# Altium PCB PCB1.PcbDoc
Units mil, origin at the board's own origin, x right, y up, seen from the top; angles counter-clockwise.
Board outline 2950 x 2951.3 mil, 2 copper layers (Top Layer, Bottom Layer); 36 components, 0 nets, 96 pads, 18 vias.
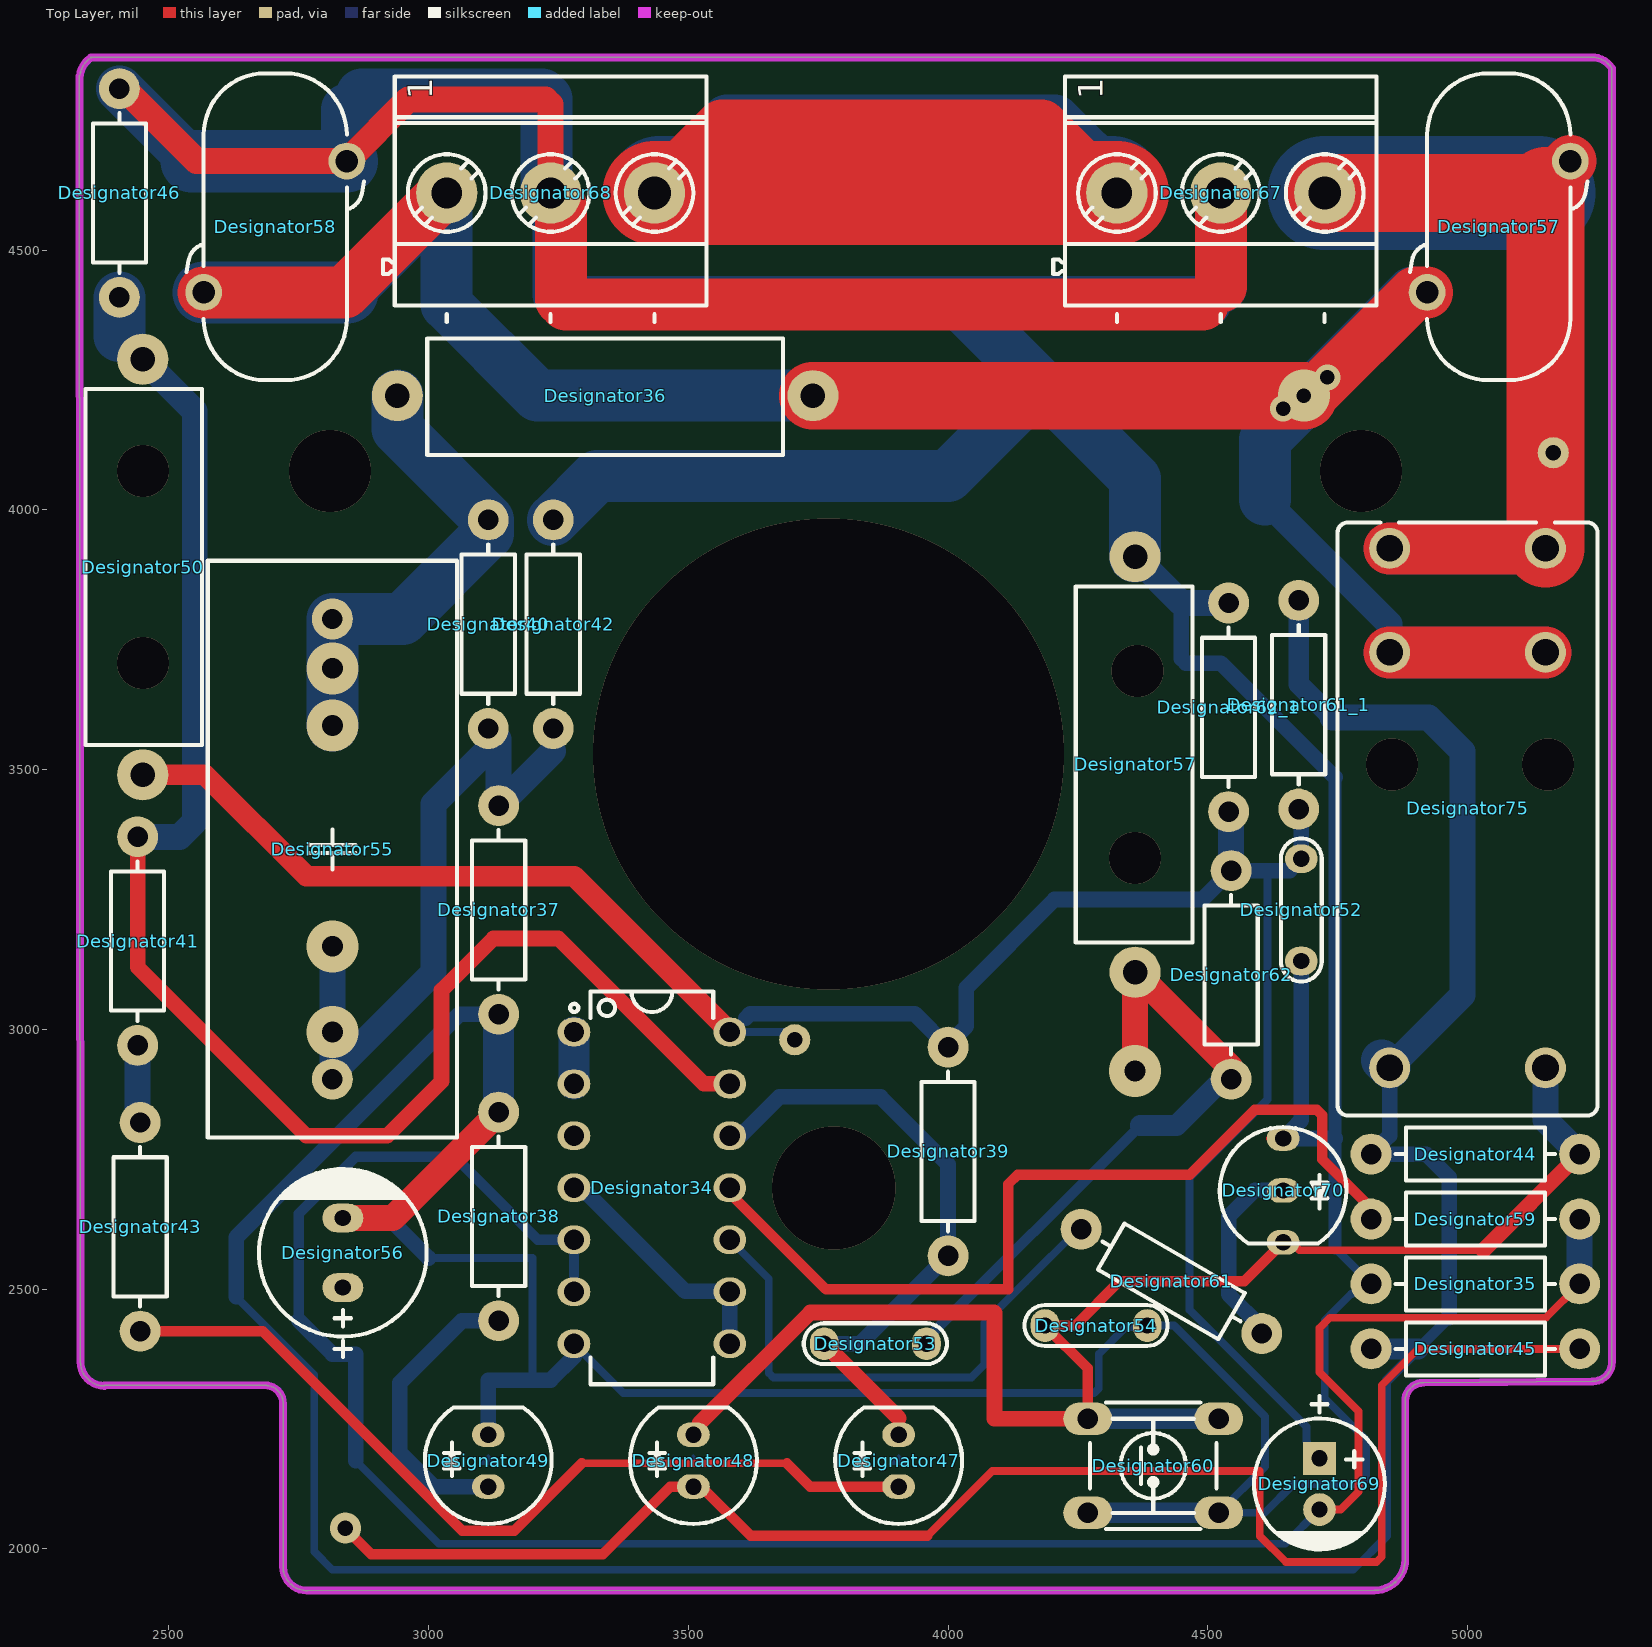
[diagram p0: Top Layer view]
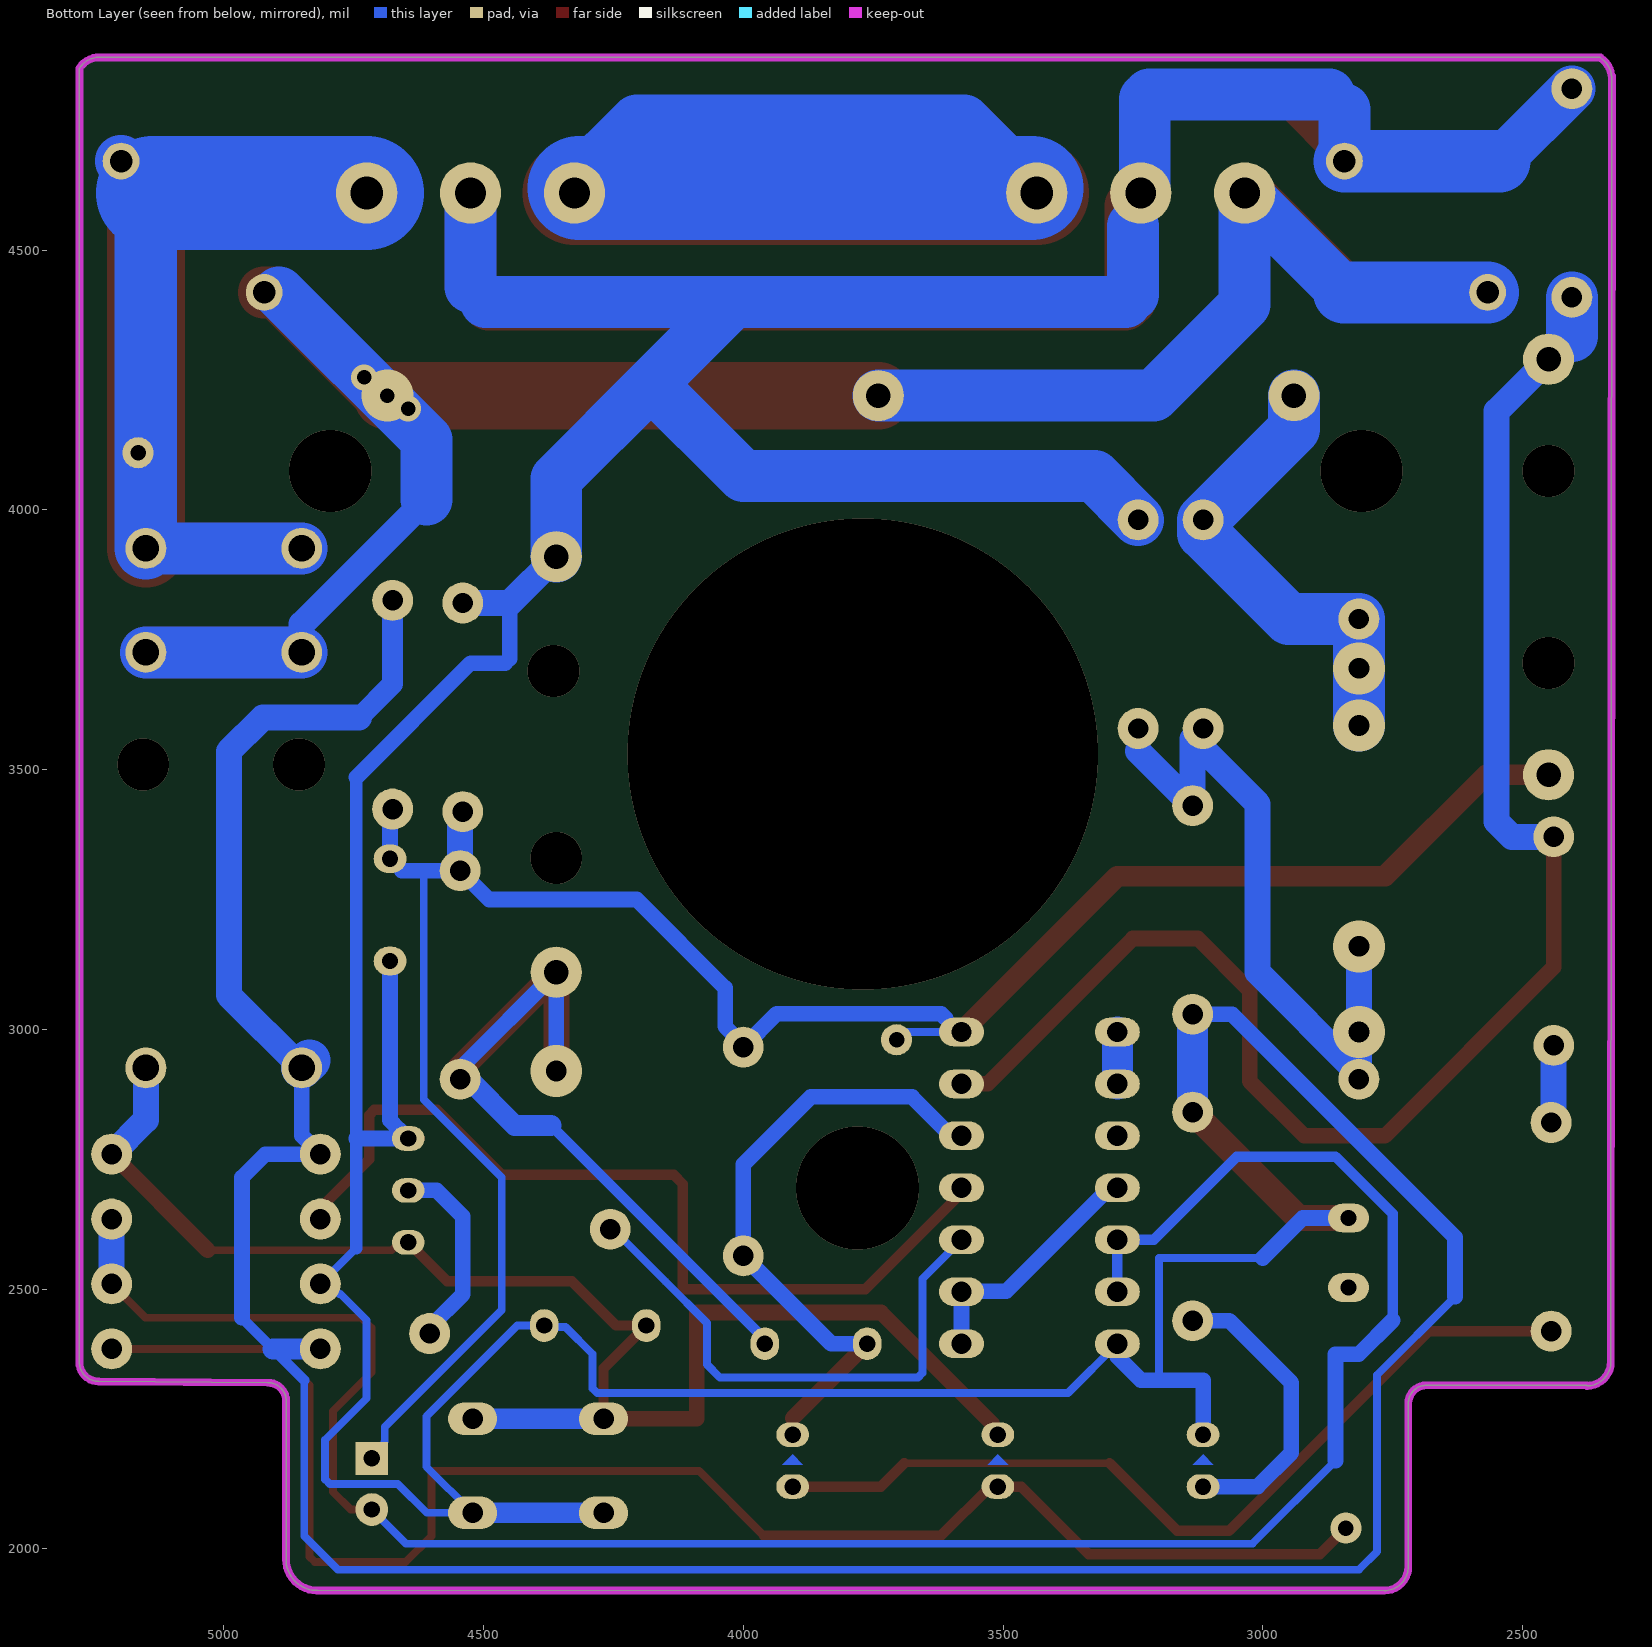
[diagram p1: Bottom Layer view, seen from below]

## Layer stack, top to bottom
Top Solder: solder mask 0.4, Solder Resist, Dk 3.5
Top Layer: signal copper 1.4
Dielectric 1: dielectric 12.6, FR-4, Dk 4.8
Bottom Layer: signal copper 1.4
Bottom Solder: solder mask 0.4, Solder Resist, Dk 3.5

## Board outline
2720,1965.89 ccw(c2766.16,1965.89) 2766.16,1919.74 4820.34,1920 ccw(c4820.34,1979.86) 4880.2,1979.86 4880,2285 cw(c4915,2285) 4915,2320 5240.77,2322.32 ccw(c5240.77,2359.49) 5277.94,2359.49 5277.94,4850 ccw(c5239,4825.21) 5244.58,4871.03 5245,4871 2350,4871 2350,4870 ccw(c2374.79,4831.06) 2328.97,4836.63 2327.94,4835 2330.04,2359.96 ccw(c2376.16,2359.96) 2376.16,2313.84 2376.16,2315 2685,2315 cw(c2685,2280) 2720,2280

## Design rules (kind name [scope] priority, off if disabled: settings)
Clearance [All] p1: gap=7 ignorepadtopadclearanceinfootprint=FALSE
PolygonConnect [All] p1: connectstyle=Relief reliefconductorwidth=10 reliefentries=4 polygonreliefangle="90 Angle" airgapwidth=10
RoutingVias [All] p1: holewidth=28 width=50 viastyle="Through Hole" minholewidth=28 minwidth=50 maxholewidth=28 maxwidth=50
SolderMaskExpansion [All] p1: expansion=4 istentingtop=FALSE
Width [All] p1: maxlimit=500 minlimit=10 preferedwidth=15 minimp=50.000000 maximp=50.000000 favimp=50.000000
30 further rules are at their usual default settings.

## Components (designator, comment, footprint, x,y, rotation, side; value= is the part's Value field where it differs from the comment)
Designator34 "Comment" DIP_14 3430,2695 r0 top
Designator35 "Comment" R025W_AX04 5015,2510 r0 top
Designator36 "Comment" R2W_AX08 3340,4220 r0 top
Designator37 "Comment" R025W_AX04 3135,3230 r90 top
Designator38 "Comment" R025W_AX04 3135,2640 r90 top
Designator39 "Comment" R025W_AX04 4000,2765 r270 top
Designator40 "Comment" R025W_AX04 3115,3780 r90 top
Designator41 "Comment" R025W_AX04 2440,3170 r90 top
Designator42 "Comment" R025W_AX04 3240,3780 r90 top
Designator43 "Comment" R025W_AX04 2445,2620 r90 top
Designator44 "Comment" R025W_AX04 5015,2760 r0 top
Designator45 "Comment" R025W_AX04 5015,2385 r0 top
Designator46 "Comment" R025W_AX04 2405,4610 r90 top
Designator47 "Comment" LED5MM_YLW 3905,2170 r90 top
Designator48 "Comment" LED5MM_YLW 3510,2170 r90 top
Designator49 "Comment" LED5MM_YLW 3115,2170 r90 top
Designator50 "Comment" R2W_AX08 2450,3890 r90 top
Designator52 "Comment" C_CER_D7 4680,3230 r90 top
Designator53 "Comment" C_CER_D7 3860,2395 r0 top
Designator54 "Comment" C_CER_D7 4285,2430 r0 top
Designator55 "Comment" C_FLM_28X12H21 2815,3347.09 r90 top
Designator56 "Comment" C_EL_8X14 2835,2570 r90 top
Designator57 "Comment" C_CERM_D15X9 5060,4545 r90 top
Designator57 "Comment" R2W_AX08 4360,3510 r270 top
Designator58 "Comment" C_CERM_D15X9 2705,4545 r90 top
Designator59 "Comment" R025W_AX04 5015,2635 r0 top
Designator60 "Comment" SWPBT_SPDT_6X6X8TL 4395,2160 r0 top
Designator61 "Comment" R025W_AX04 4430,2515 r150 top
Designator61_1 "Comment" R025W_AX04 4675,3625 r90 top
Designator62 "Comment" R025W_AX04 4545,3105 r90 top
Designator62_1 "Comment" R025W_AX04 4540,3620 r90 top
Designator67 "Comment" PHOENIX_1707917 4525,4610 r0 top
Designator68 "Comment" PHOENIX_1707917 3235,4610 r0 top
Designator69 "Comment" C_EL_6X7 4715,2125 r270 top
Designator70 "Comment" LED5BI 4645,2690 r270 top
Designator75 "Comment" REL_TYCO_SCHRACK_RT44XXXX 5000,3405 r90 top

## Footprints (in the part's own frame and the unit in brackets; to place one, negate y for a bottom-side part, rotate by r counter-clockwise, add the part's x,y. Pads: shape width x height; smd on the part's side, far side on the other; paste and mask are expansions set on the pad)
C_CER_D7 [mm] "CAP, CER MULTILAYER, 7.0X1.7mm, pitch: 5.0mm"
  oval 1.4x1.6 hole 0.8 mask+0.075: 1(-2.5,0) 2(2.5,0)
  silkscreen extent -3.5,-1 3.5,1, body extent -3.5,-0.85 3.5,0.85
C_CERM_D15X9 [mm] "CAP, CER, High Voltage MultiLayer"
  round 1.8 hole 1.1: 1(-3.211,3.5) 2(3.211,-3.5)
  silkscreen extent -7.5,-4.34 7.5,4.33, body extent -7.5,-4.5 7.5,4.5, height 19
C_EL_6X7 [mm] "Capacitor Electrolythic, D6.3X7.0H pitch: 2.5mm"
  rect 1.6x1.6 hole 0.8: 1(-1.25,0)
  round 1.6 hole 0.8: 2(1.25,0)
  silkscreen extent -4.3,-3.2 3.2,3.2, body extent -2.99,-2.99 3,3, height 7.3
C_EL_8X14 [mm] "Capacitor Electrolythic, D8X14H pitch: 3.5mm"
  oval 1.4x2 hole 0.8: 1(-1.7,0) 2(1.7,0)
  silkscreen extent -5.1,-4.1 4.1,4.1, body extent -4.09,-4.1 4.1,4.1, height 14.6
C_FLM_28X12H21 [mm] "Capacitor, THT, Metallized Polyester Film with 28x12x21mm LxTxH"
  round 2 hole 1: 1(-11.25,0) 2(11.25,0)
  silkscreen extent -14.1,-6.1 14.1,6.1, body extent -14,-6 14,6, height 24
DIP_14 [mm] "DIP, pitch 2.54mm, 300mil Width"
  oval 1.6x1.4 / inner round 1.4 / far side oval 2.2x1.4 hole 1: 1(-3.81,7.62) 2(-3.81,5.08) 3(-3.81,2.54) 4(-3.81,0) 5(-3.81,-2.54) 6(-3.81,-5.08) 7(-3.81,-7.62) 8(3.81,-7.62) 9(3.81,-5.08) 10(3.81,-2.54) 11(3.81,0) 12(3.81,2.54) 13(3.81,5.08) 14(3.81,7.62)
  silkscreen extent -4,-9.6 3,9.6, body extent -4,-9.53 4,9.52, height 3.81
LED5BI [mm] "LED THD 5MM BICOLOR"
  oval 1.2x1.6 hole 0.8: 1(-2.54,0) 2(0,0) 3(2.54,0)
  silkscreen extent -3.1,-3.1 2.6,3.1, body extent -2.95,-2.95 2.79,2.95, height 11.01
LED5MM_YLW [mm] "LED THD 5MM YELLOW"
  oval 1.2x1.6 hole 0.8: 1(-1.27,0) 2(1.27,0)
  Bottom Layer region: -0.2,0.5 -0.2,-0.5 0.3,0
  silkscreen extent -3.1,-3.1 2.6,3.1, body extent -3,-3 2.5,3, height 9.14
PHOENIX_1707917 [mm] "PHOENIX MKDS Serie, Pitch 5.08mm, 24A, 400V, 3 Positions Header"
  round 3 hole 1.5: 1(-5.08,0) 2(0,0)
  round 3 hole 1.6: 3(5.08,0)
  silkscreen extent -8.19,-6.31 7.62,5.7, body extent -8.19,-5.5 7.62,5.7, height 18.29
R2W_AX08 [mm] "RESISTOR 2 WATT, AXIAL0.8"
  round 2.5 hole 1.2: 1(-10.16,0) 2(10.16,0)
  silkscreen extent -8.7,-2.9 8.7,2.8, body extent -10.51,-2.8 10.51,2.7, height 5.5
R025W_AX04 [mm] "RESISTOR 1/4 WATT, AXIAL0.4"
  round 2 hole 1: 1(-5.1,0) 2(5.1,0)
  silkscreen extent -3.9,-1.3 3.9,1.3, body extent -5.38,-1.28 5.38,1.28, height 2.6
REL_TYCO_SCHRACK_RT44XXXX [mm] "6 Leads, Row Spacing 7.5 mm; Body 29mm x 12.7mm, TYCO RT2 Series"
  round 2 hole 1.3: 11(8.15,-3.81) 14(13.23,-3.81) 21(8.15,3.81) 24(13.23,3.81) A1(-12.17,-3.81) A2(-12.17,3.81)
  silkscreen extent -14.5,-6.35 14.5,6.35, body extent -14.52,-6.43 14.48,6.27, height 15.7
SWPBT_SPDT_6X6X8TL [mm] "SWITCH, PUSHBUTTON, THD, SPDT, 8.0mm, TL-1105-C"
  oval 2.4x1.6 hole 1 mask+0.1: 1(-3.2,2.3) 2(-3.2,-2.3) 3(3.2,-2.3) 4(3.2,2.3)
  silkscreen extent -3.1,-3.1 3.1,3.1, body extent -3.95,-3 3.95,3, height 8

## Free pads (board coordinates)
  round 60 hole 30: 2(2840,2040) 2(3705,2980) 3(5165,4110)

## Via types
v1: diameter 100, hole 100, Top Layer to Bottom Layer, 6 vias
v2: diameter 100, hole 40, Top Layer to Bottom Layer, 5 vias
v3: diameter 50, hole 28, Top Layer to Bottom Layer, 2 vias
v4: diameter 158, hole 158, Top Layer to Bottom Layer, 2 vias
v5: diameter 100, hole 28, Top Layer to Bottom Layer, 1 vias
v6: diameter 237, hole 237, Top Layer to Bottom Layer, 1 vias
v7: diameter 906, hole 906, Top Layer to Bottom Layer, 1 vias

## Nets (pads, with @x,y where several pads share a name; then routed paths per layer and width w, separated by ;. In a path a pad name is that pad's centre, name@x,y a point inside that pad or via, vN(x,y) a via of type N, cw(c..) or ccw(c..) an arc to the next point about the centre after c; other vN are vias at no path point)
pads on no net: Designator34.1 Designator34.2 Designator34.3 Designator34.4 Designator34.5 Designator34.6 Designator34.7 Designator34.8 Designator34.9 Designator34.10 Designator34.11 Designator34.12 Designator34.13 Designator34.14 Designator35.1 Designator35.2 Designator36.1 Designator36.2 Designator37.1 Designator37.2 Designator38.1 Designator38.2 Designator39.1 Designator39.2 Designator40.1 Designator40.2 Designator41.1 Designator41.2 Designator42.1 Designator42.2 Designator43.1 Designator43.2 Designator44.1 Designator44.2 Designator45.1 Designator45.2 Designator46.1 Designator46.2 Designator47.1 Designator47.2 Designator48.1 Designator48.2 Designator49.1 Designator49.2 Designator50.1 Designator50.2 Designator52.1 Designator52.2 Designator53.1 Designator53.2 Designator54.1 Designator54.2 Designator55.1 Designator55.2 Designator56.1 Designator56.2 Designator57.1 Designator57.2 Designator58.1 Designator58.2 Designator59.1 Designator59.2 Designator60.1 Designator60.2 Designator60.3 Designator60.4 Designator61.1 Designator61.2 Designator61_1.1 Designator61_1.2 Designator62.1 Designator62.2 Designator62_1.1 Designator62_1.2 Designator67.1 Designator67.2 Designator67.3 Designator68.1 Designator68.2 Designator68.3 Designator69.1 Designator69.2 Designator70.1 Designator70.2 Designator70.3 Designator75.11 Designator75.14 Designator75.21 Designator75.24 Designator75.A1 Designator75.A2
copper on no net: | length 60634.6
  Top Layer w15: 2405,4810.79 2414.21,4810.79 ; 3030,4610 3035,4610 ; 3225,4790 3235,4780 ; 3230,4430 3265,4395 ; 3295,2165 3690,2165 ; 3510,2120 3525,2120 ; 3580,2685 3580,2695 ; 3905,2220 3905,2251.57 ; 3958.43,2395 3958.43,2403.43 ; 3960,2025 4085,2150 4600,2150 4600,2025 4650,1975 4825,1975 4835,1985 4835,2315 4905,2385 4980,2385 5215.79,2385 ; 4088.9,2455 4089.45,2454.45 ; 4310,4610 4325,4610 ; 4490,4395 4525,4430 ; 4544.21,2905 4545,2904.21 4545,2925 ; 4620,2790 4645,2790 ; 4645,2590 4661.6,2590 4676.6,2575 4740,2575 5030.79,2575 ; v5(4685,4220) v5@4723.63,4220 ; 4715,2075.79 4755.79,2075.79 4790,2110 4790,2265 4715,2340 4715,2425 4735,2445 5150.79,2445 5215.79,2510 ; 4814.21,2635 4814.21,2655.79 ; 5136.37,4610 5197.8,4671.43 ; 5150,3925.87 5150.87,3925 5165,3925
  Top Layer w20: 2445,2419.21 2570.79,2419.21 2680.79,2419.21 3065,2035 3165,2035 3295,2165 ; 2840,2040 2890,1990 3335,1990 3465,2120 3510,2120 ; 3525,2120 3620,2025 3960,2025 ; 3580,2685 3765,2500 3910,2500 4116.21,2500 4116.21,2702.43 4133.79,2720 4465,2720 4590,2845 4675,2845 4710,2845 4720,2835 4720,2750 4814.21,2655.79 ; 3690,2165 3735,2120 3905,2120 ; 4269.02,2250.55 4269.02,2347.56 4186.57,2430 4245,2430 4330,2515 4570,2515 4645,2590
  Top Layer w30: 2440,3370.79 2440,3120 2765,2795 2920,2795 3025,2900 3025,3075 3125,3175 3250,3175 3530,2895 3580,2895 ; 3510,2220 3513.21,2220 3521.17,2227.97 3521.17,2241.17 3735,2455 4000.42,2455 4088.9,2455 ; 3761.57,2395 3905,2251.57 ; 4089.45,2454.45 4089.45,2250.55 4269.02,2250.55 ; 5030.79,2575 5215.79,2760
  Top Layer w40: 2450,3490 2570,3490 2765,3295 3280,3295 3580,2995
  Top Layer w50: 2414.21,4810.79 2553.57,4671.43 2842.8,4671.43 2961.37,4790 3225,4790 ; 2835.01,2636.93 2931.14,2636.93 3135,2840.79 ; 3235,4610 3235,4780 ; v2(4360,2920) 4360,3110 4545,2925
  Top Layer w100: 2567.2,4418.57 2838.57,4418.57 3030,4610 ; 3235,4610 3235,4605.1 3255,4585.1 3255,4405 ; 3265,4395 4490,4395 ; 3435,4610 3565,4740 4180,4740 4310,4610 ; 4525,4430 4525,4610 ; v5(4685,4220) 4700,4220 4898.57,4418.57 4922.2,4418.57 ; 4850,3725.87 5150,3725.87 ; 4850,3925.87 5150,3925.87 ; 5150,4623.63 5197.8,4671.43
  Top Layer w130: 3740,4220 v5(4685,4220)
  Top Layer w150: 4725,4610 5136.37,4610 ; 5150,3925.87 5150,4623.63
  Top Layer w200: 3435,4610 4325,4610
  Bottom Layer w15: 2405,4335 2450,4290 ; 2630,2485 2780,2335 2780,2130 2780,1995 2815,1960 4780,1960 4845,2025 4845,2325 ; 2815,2904.17 2815,2915 ; 2860,2170 3020,2010 4649.21,2010 4715,2075.79 ; 3000,2560 3200,2560 3200,2325 ; 3218.44,4800 3227.23,4791.21 ; 3227.23,4617.77 3235,4610 ; 3240,3535.79 3240,3579.21 ; 3280,2370 3280,2395 3375,2300 4281.21,2300 4290,2308.79 4290,2375 4342.15,2427.15 4380.58,2427.15 4383.43,2430 4435,2430 4610,2255 4610,2158.46 4520.98,2069.45 4609.45,2069.45 4665,2125 4796.21,2125 4805,2133.79 4805,2210 4725,2290 4725,2440 4775.86,2490.86 4777.82,2490.86 4796.96,2510 4814.21,2510 4745,2579.21 ; 3280,2695 3285.77,2689.23 ; 3579.23,2495.77 3580,2495 ; 3580,2595 3655,2520 3655,2338.79 3663.79,2330 4045,2330 4070,2355 4070,2435 4150,2515 4250.39,2615.39 4256.11,2615.39 ; 3590,2795 3580,2795 3600,2795 ; 3610.33,3021.21 3610.33,3020.44 3584.89,2995 3580,2995 3690,2995 3705,2980 ; 3958.43,2395 3958.43,2403.43 ; 4000,2965.79 4000,2970.86 ; 4325,4610 4325,4630 ; 4449.21,3713.79 4458,3705 ; 4529.21,2904.21 4545,2904.21 4545,2925 ; 4603.89,2414.61 4603.89,2426.11 ; 4615,3305 4615,2935 4615,2865 4465,2715 4465,2655 4465,2460 4689.29,2235.71 4690,2235 4690,2207 4691,2205.99 4691,2198.21 4715,2174.21 ; 4680,3124.66 4680,3131.57 ; 4893.57,4418.57 4922.2,4418.57 ; 4905,2385 4910,2390 ; 5136.37,4610 5197.8,4671.43
  Bottom Layer w20: 2750,2440 2750,2585 2750,2645 2860,2755 3050,2755 3210,2595 3280,2595 3280,2495 ; 3958.43,2403.43 4370,2815 ; 4845,2325 4965,2445
  Bottom Layer w25: 4745,2579.21 4745,3485
  Bottom Layer w30: 2630,2485 2630,2600 3059.21,3029.21 3135,3029.21 ; 2750,2440 2815,2375 2860,2375 2860,2170 ; 2835.01,2636.93 2923.07,2636.93 3000,2560 ; 3115,2120 3010,2120 2945,2185 2945,2320 3064.21,2439.21 3135,2439.21 ; 3115,2220 3115,2325 3200,2325 3235,2325 3280,2370 ; 3285.77,2689.23 3300.77,2689.23 3494.23,2495.77 3579.23,2495.77 ; 3580,2395 3580,2495 ; 3600,2795 3675,2870 3870,2870 4000,2740 4000,2564.21 3830.79,2395 3761.57,2395 ; 3610.33,3021.21 3619.12,3030 3935.79,3030 4000,2965.79 ; 4000,2970.86 4035,3005.86 4035,3080 4205,3250 4489.21,3250 4545,3305.79 4657.36,3305.79 ; v2(4360,2920) 4360,3110 4545,2925 ; 4449.21,3713.79 4449.21,3820.79 ; 4458,3705 4525,3705 4745,3485 ; 4603.89,2426.11 4540,2490 4540,2640 4590,2690 4645,2690 ; 4680,3124.66 4680,2825 4661.5,2806.5 4661.5,2803.29 4648.21,2790 4645,2790 4745,2790 ; 4680,3328.43 4680,3419.21 ; 4850,2925.87 4850,2795.79 4814.21,2760 4920,2760 4965,2715 4965,2445
  Bottom Layer w40: 4269.02,2069.45 4520.98,2069.45 ; 4269.02,2250.55 4520.98,2250.55 ; 4370,2815 4440,2815 4529.21,2904.21 ; 4675,3825.79 4675,3665 4740,3600 ; 4814.21,2385 4905,2385
  Bottom Layer w50: 2440,2825.79 2440,2969.21 ; 2440,3370.79 2520.71,3370.79 2550,3400.08 2550,3810 2550,4190 2450,4290 ; 2815,2904.17 v2(2815,2995) v2(2815,3160) ; 2815,2915 3010,3110 3010,3434.21 3135,3559.21 3135,3430.79 3240,3535.79 ; 2842.8,4770.71 2872.08,4800 ; 3235,4610 3248.03,4596.97 3248.03,4548.81 3250,4546.84 ; 3250,4414.29 3264.29,4400 ; 4360,3910 4449.21,3820.79 4540,3820.79 ; 4495.71,4400 4525,4429.29 ; 4545,3305.79 4545,3414.21 ; 4610,4020 4850,3780 4850,3725.87 ; 4740,3600 4850,3600 4925,3600 4990,3535 4990,3065.87 4850,2925.87 ; 5150,2925.87 5150,2825.79 5215.79,2760 ; 5215.79,2510 5215.79,2635
  Bottom Layer w60: 3135,2840.79 3135,3029.21 ; 3280,2895 3280,2995
  Bottom Layer w80: 4835,2940.87 4850,2925.87
  Bottom Layer w90: 2405,4810.79 2544.36,4671.43
  Bottom Layer w100: 2405,4335 2405,4409.21 ; v2(2815,3585) v2(2815,3695) 2815,3790 2950,3790 3115,3955 3115,3980.79 2940,4155.79 2940,4220 ; 2842.8,4671.43 2842.8,4770.71 ; 2843.57,4418.57 3035,4610 3035,4395 3210,4220 3740,4220 ; 2872.08,4800 3218.44,4800 ; 3227.23,4617.77 3227.23,4791.21 ; 3240,3980.79 3324.21,4065 4000,4065 4177.5,4242.5 ; 3250,4414.29 3250,4546.84 ; 3264.29,4400 4020,4400 ; 3435,4610 3575,4750 4205,4750 4325,4630 ; 4360,3910 4360,4060 4177.5,4242.5 ; 4495.71,4400 4020,4400 ; 4525,4429.29 4525,4610 ; 4610,4020 4610,4135 4893.57,4418.57 ; 4850,3725.87 5150,3725.87 ; 4850,3925.87 5150,3925.87 ; 5150,4623.63 5197.8,4671.43 ; 4020,4400 4177.5,4242.5
  Bottom Layer w120: 2544.36,4671.43 2842.8,4671.43 ; 2567.2,4418.57 2843.57,4418.57 ; 5150,3925.87 5150,4623.63
  Bottom Layer w200: 3445,4620 4315,4620
  Bottom Layer w220: 4725,4610 5136.37,4610
  other v1: 4360,3330 4855,3510 5155,3510 4365,3690 2450,3705 2450,4075
  other v3: 4645,4195 4730,4255
  other v4: 2810,4075 4795,4075
  other v6: 3780,2695
  other v7: 3770,3530

## Keep-outs
Keep-Out Layer:
  lines w15: 2327.94,4835 2330.04,2359.96 ccw(c2376.16,2359.96) 2376.16,2313.84 ; 2328.97,4836.63 cw(c2374.79,4831.06) 2350,4870 ; 2350,4871 5245,4871 ; 2376.16,2315 2685,2315 cw(c2685,2280) 2720,2280 2720,1965.89 ccw(c2766.16,1965.89) 2766.16,1919.74 4820.34,1920 ccw(c4820.34,1979.86) 4880.2,1979.86 4880,2285 cw(c4915,2285) 4915,2320 5240.77,2322.32 ccw(c5240.77,2359.49) 5277.94,2359.49 5277.94,4850 ccw(c5239,4825.21) 5244.58,4871.03

## Text inside footprints (layer, text, board x,y; h text height)
Designator67: Top Overlay "1" at 4297.64,4790.12 h47.24 r90; Mechanical 14 "1" at 4297.64,4790.12 h47.24 r90
Designator68: Top Overlay "1" at 3007.64,4790.12 h47.24 r90; Mechanical 14 "1" at 3007.64,4790.12 h47.24 r90